# Altium PCB STM32F407VET6 2.PcbDoc
Units mm, origin at the board's own origin, x right, y up, seen from the top; angles counter-clockwise.
Board outline 85.1 x 72.5 mm, 4 copper layers (Top Layer, PWR, GND, Bottom Layer), stack 0.487 mm thick; 78 components, 115 nets, 433 pads, 39 vias.
Unrouted connection lines stored in the file: 292.
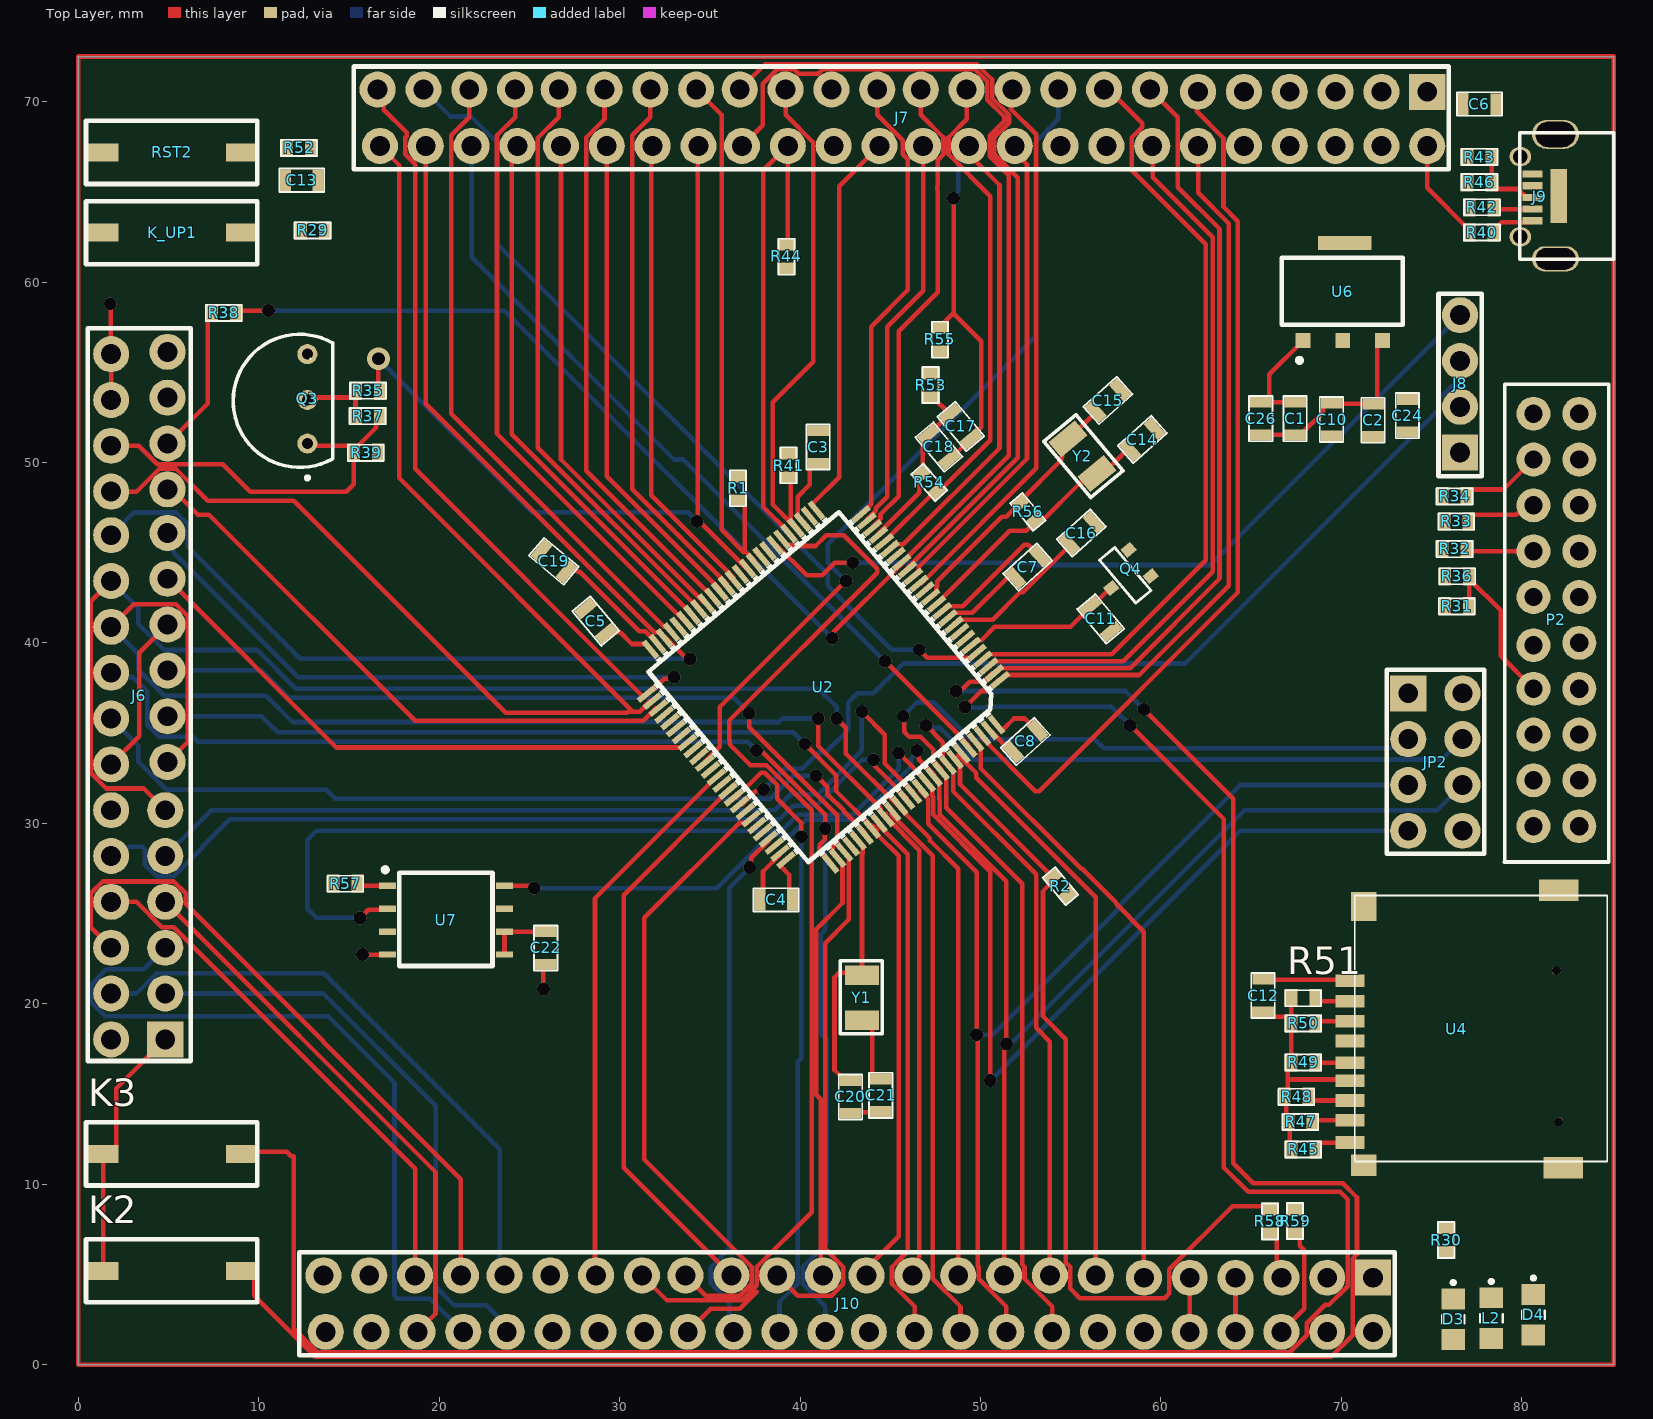
[diagram p0: Top Layer view]
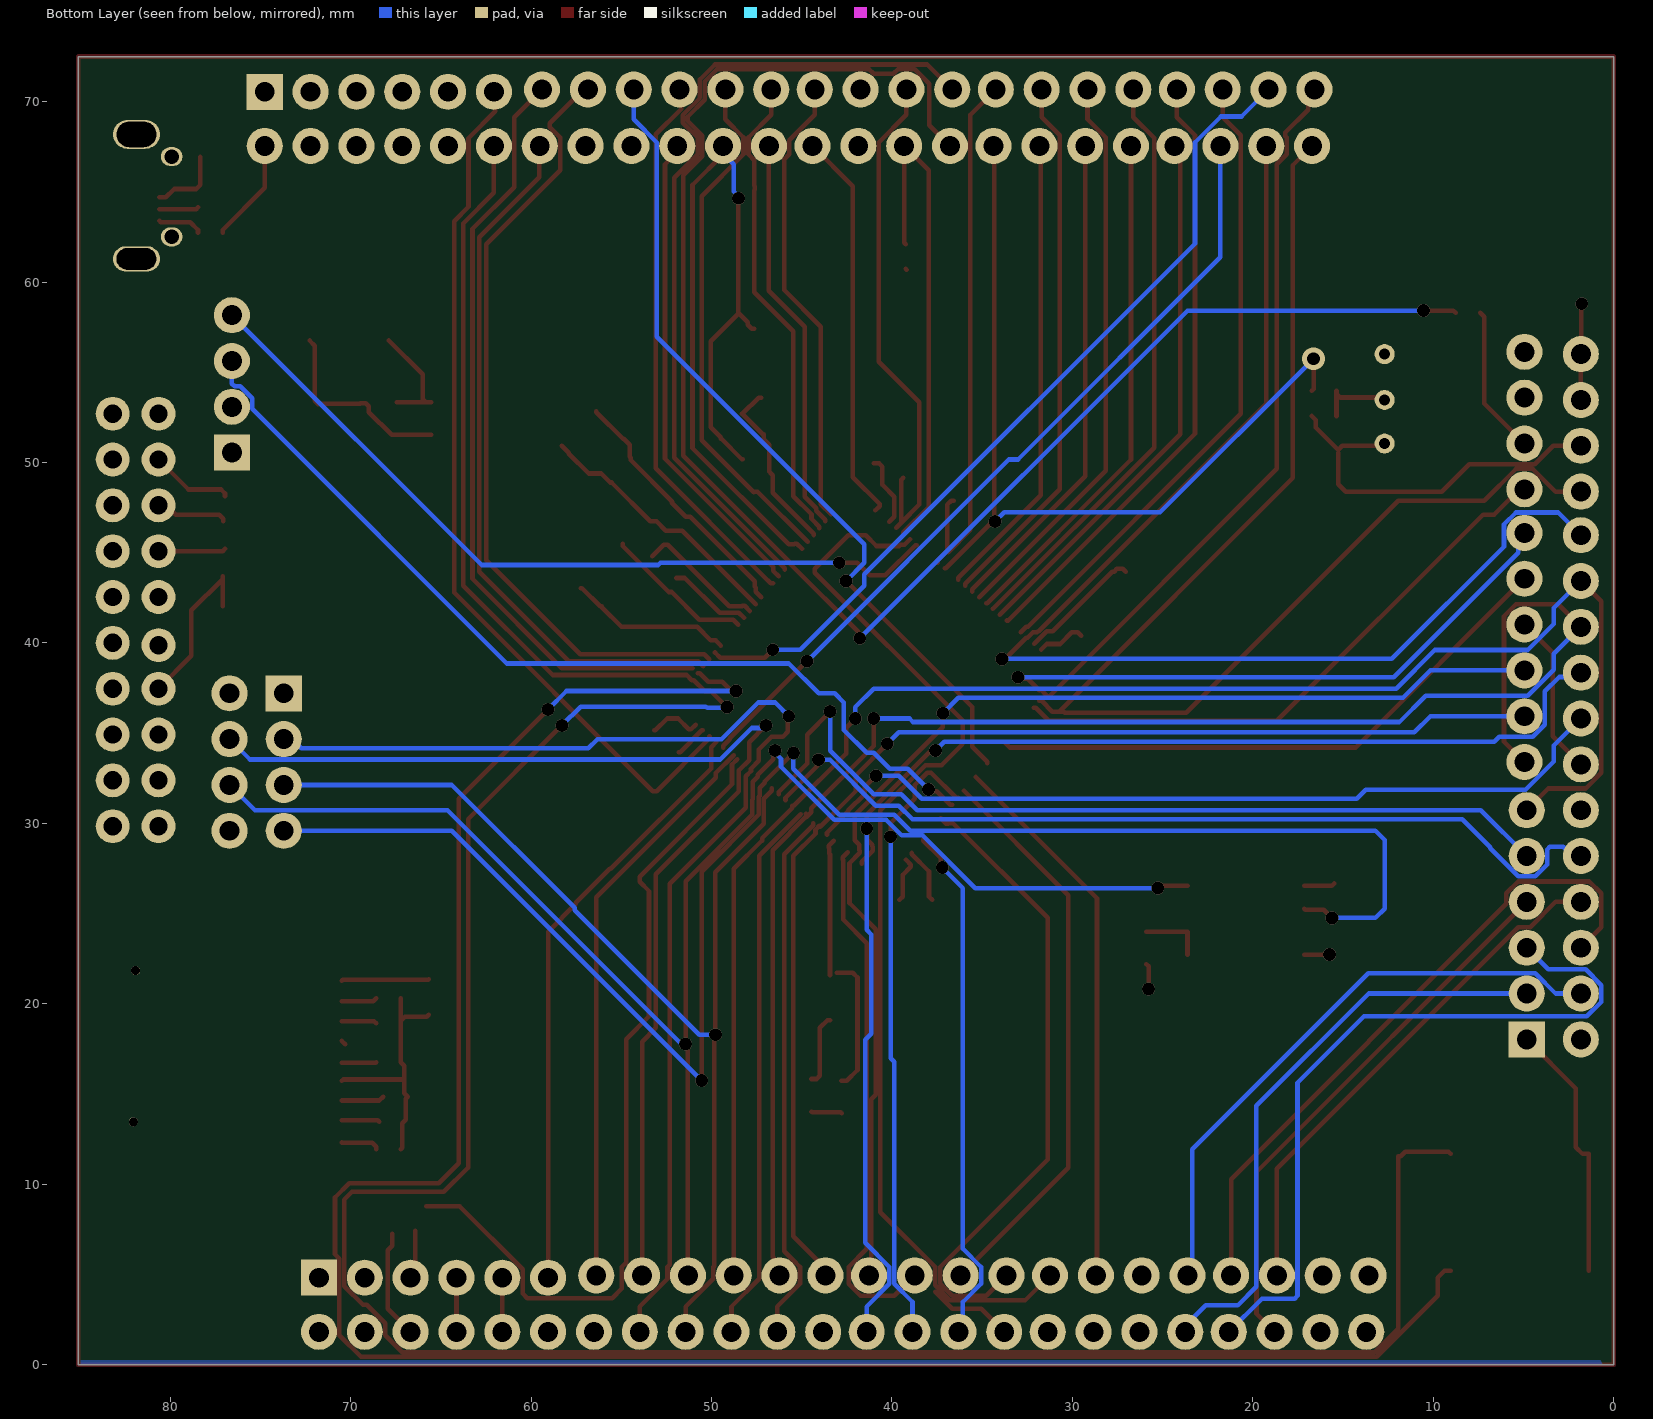
[diagram p1: Bottom Layer view, seen from below]
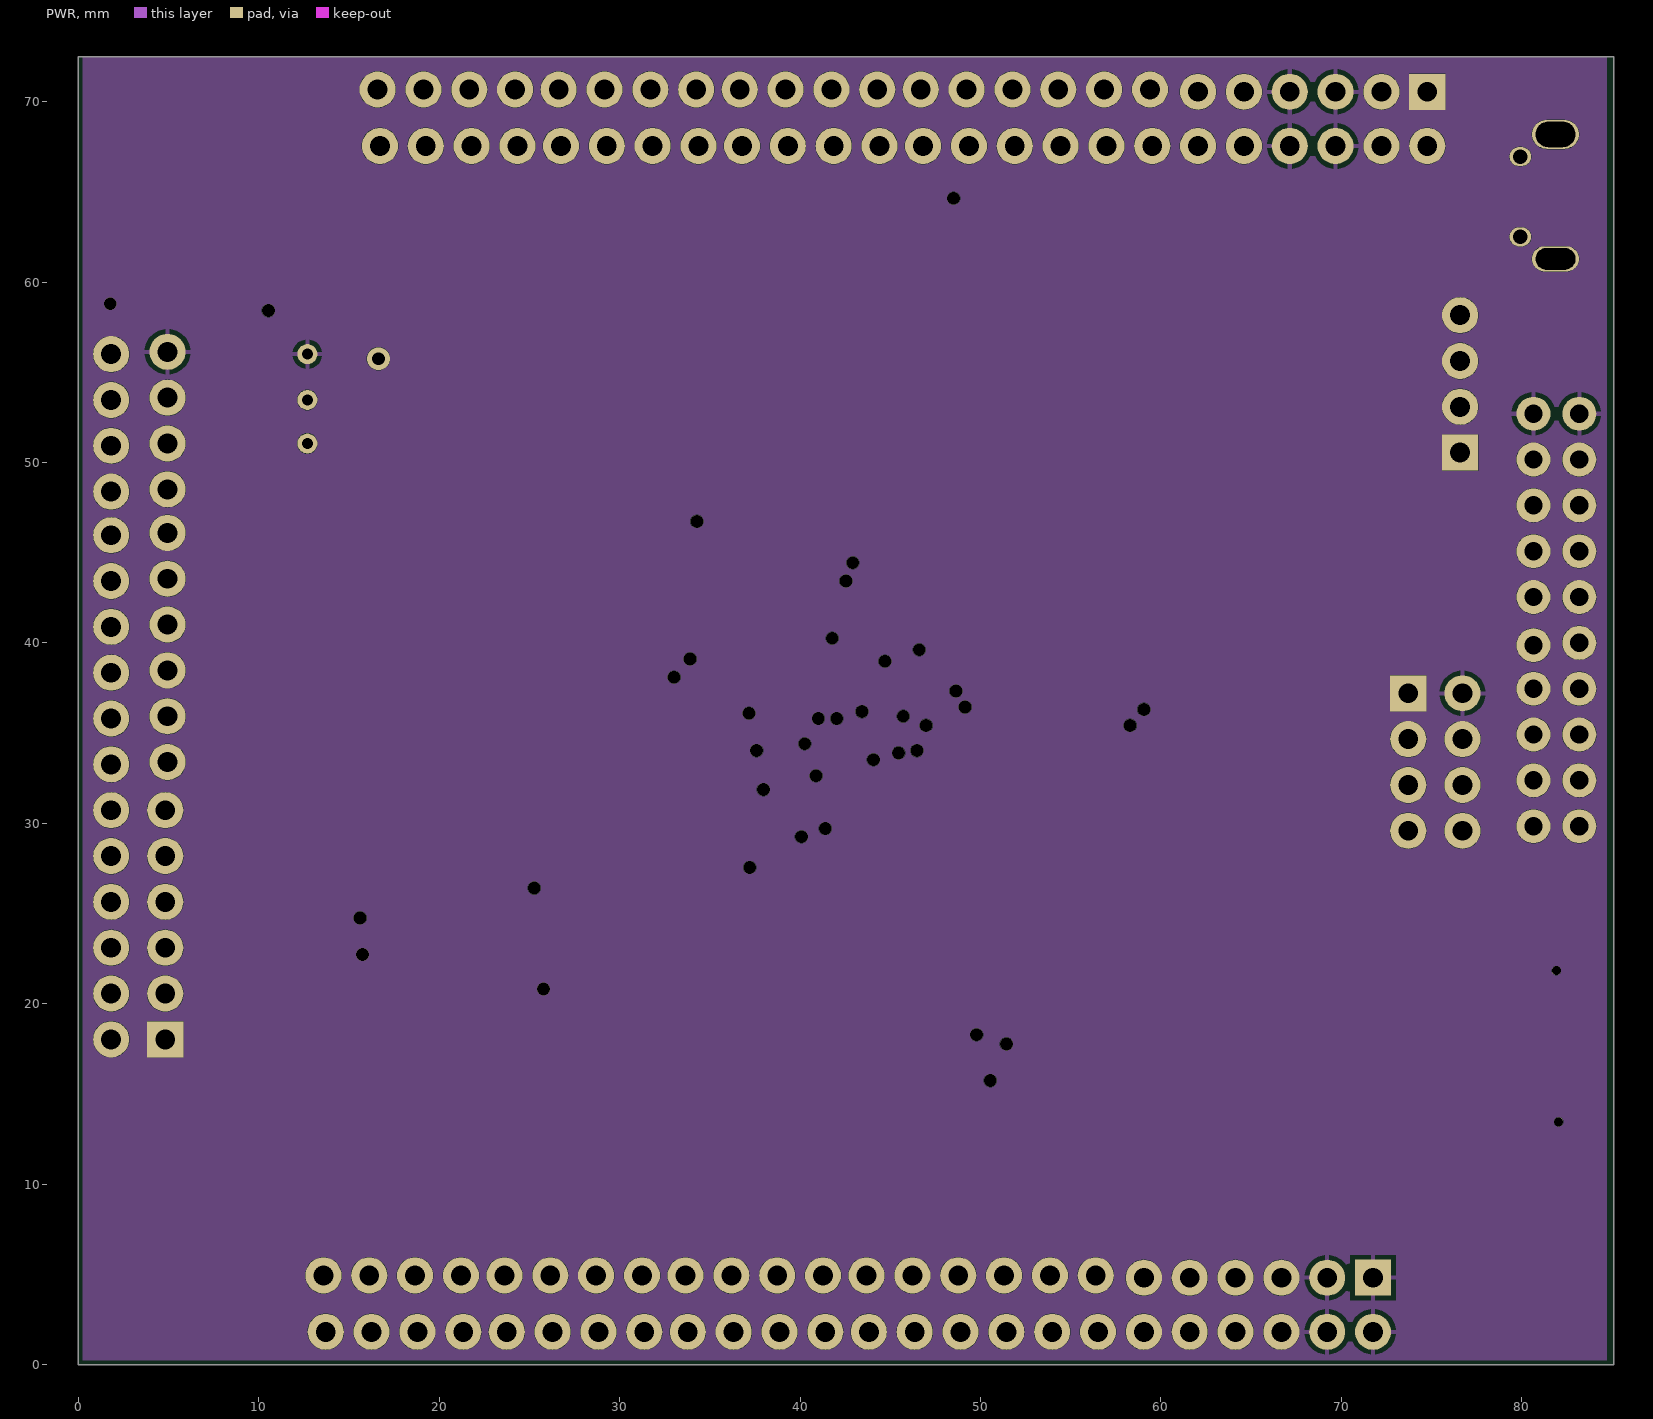
[diagram p2: PWR]
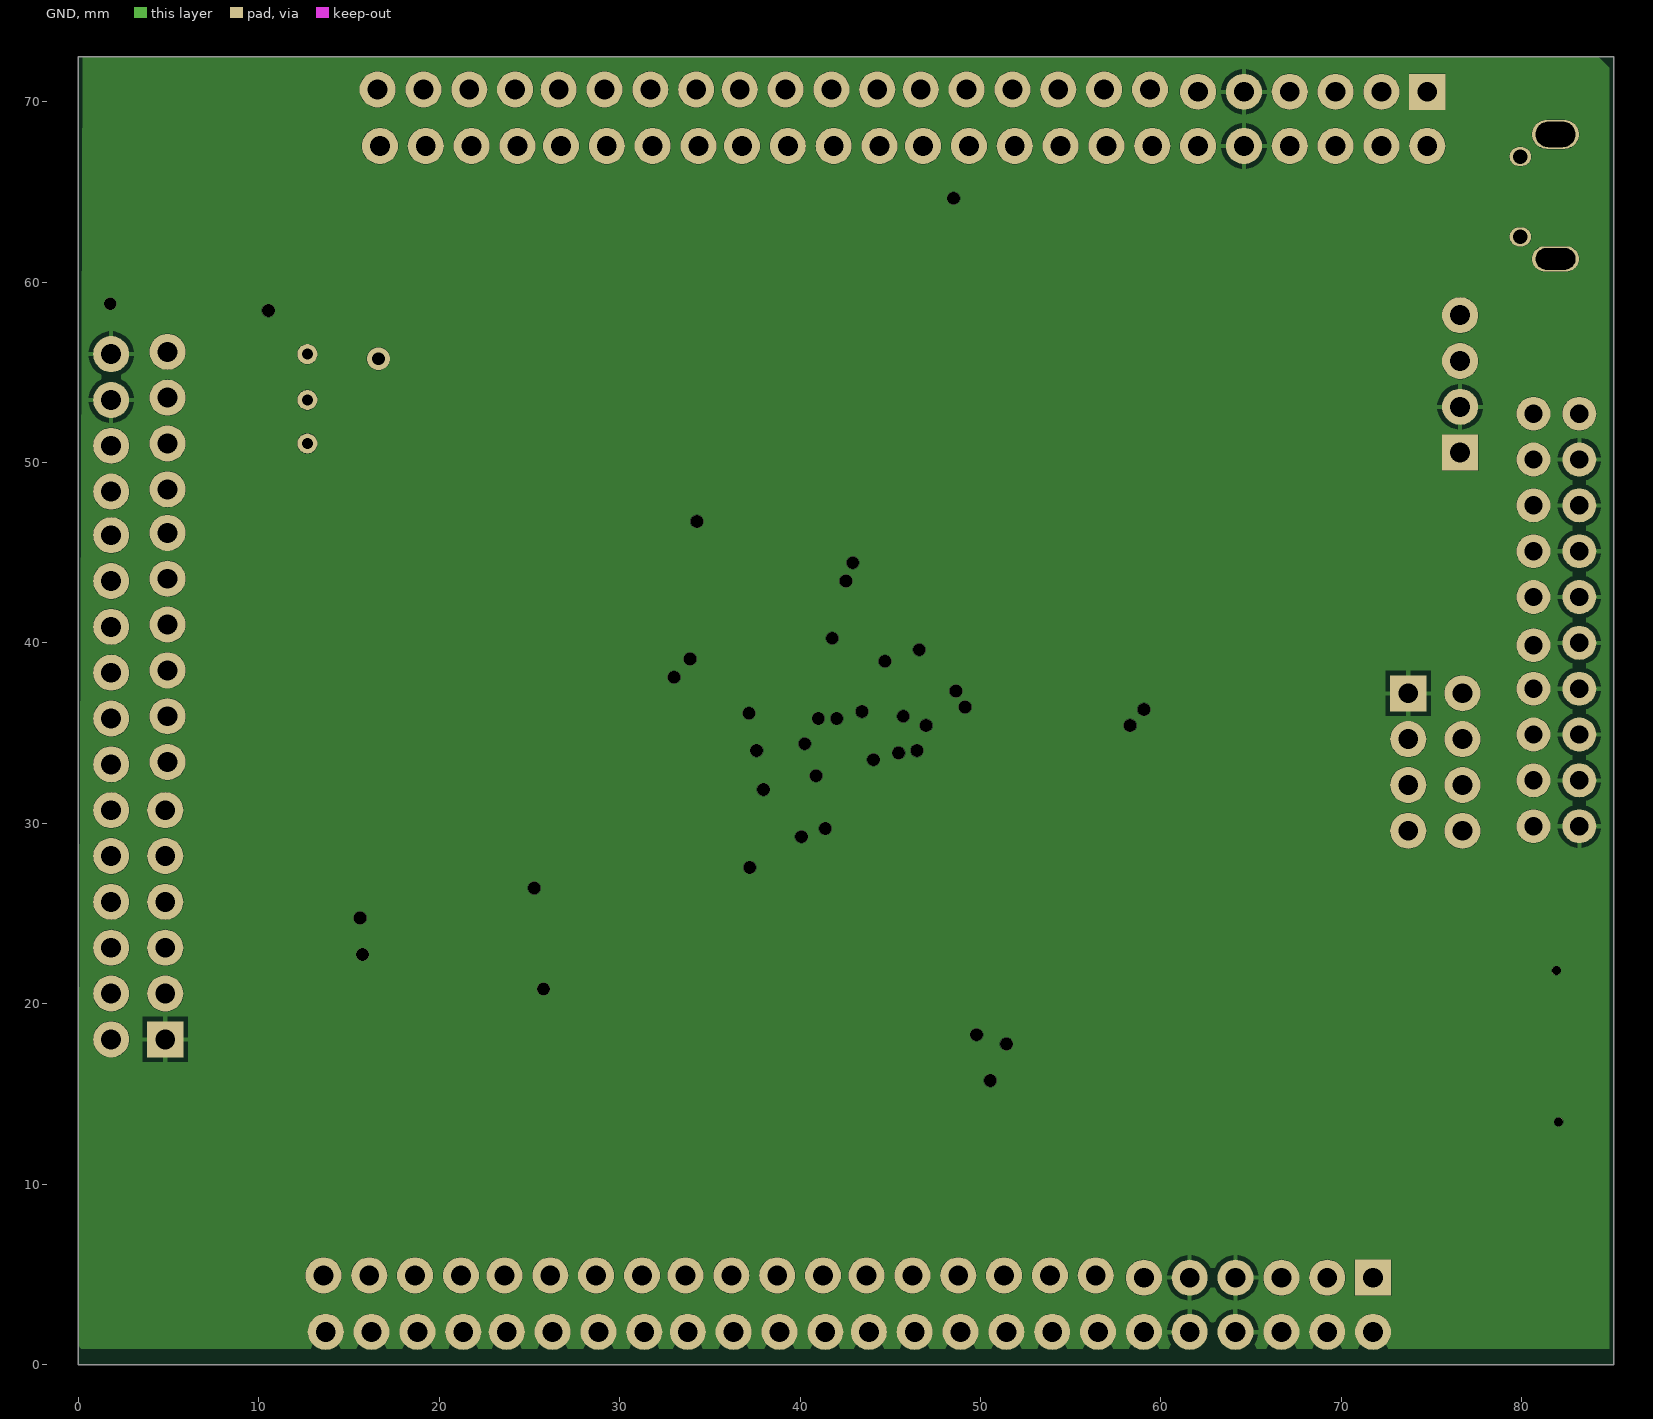
[diagram p3: GND]

## Layer stack, top to bottom
Top Solder: solder mask 0.0102, Solder Resist, Dk 3.5
Top Layer: signal copper 0.0356
Dielectric 2: prepreg 0.0711, PP-006, Dk 4.1
PWR: signal copper 0.035
Dielectric 1: core 0.2032, Core-025, Dk 4.6
GND: signal copper 0.035
Dielectric 3: prepreg 0.0711, PP-006, Dk 4.1
Bottom Layer: signal copper 0.0356
Bottom Solder: solder mask 0.0102, Solder Resist, Dk 3.5

## Board outline
0,0 0,72.5 85.097,72.5 85.097,0

## Design rules (kind name [scope] priority, off if disabled: settings)
Clearance [All] p1: gap=0.003 ignorepadtopadclearanceinfootprint=FALSE
PolygonConnect [All] p1: connectstyle=Relief reliefconductorwidth=0.254 reliefentries=4 polygonreliefangle="90 Angle" airgapwidth=0.254
RoutingVias [All] p1: holewidth=0.711 width=1.27 viastyle="Through Hole" minholewidth=0.711 minwidth=1.27 maxholewidth=0.711 maxwidth=1.27
SolderMaskExpansion [All] p1: expansion=0.102 istentingtop=FALSE
SupplyNets "Schematic Supply Nets_5" [InNet('3V3')] p1: voltage=0.000
SupplyNets "Schematic Supply Nets_4" [InNet('5V')] p2: voltage=0.000
SupplyNets "Schematic Supply Nets_1" [InNet('+3V3')] p3: voltage=0.000
SupplyNets "Schematic Supply Nets_2" [InNet('VCC')] p4: voltage=0.000
SupplyNets "Schematic Supply Nets" [InNet('GND')] p5: voltage=0.000
Width [All] p1: maxlimit=0.254 minlimit=0.254 preferedwidth=0.254
30 further rules are at their usual default settings.

## Components (designator, comment, footprint, x,y, rotation, side; value= is the part's Value field where it differs from the comment)
C1 "1" CAPACITOR 67.545,51.6 r90 top
C2 "1" CAPACITOR 71.647,53.175 r270 top
C3 "capacitor symbol" CAPACITOR 40.894,51.689 r270 top value=1uF
C4 "capacitor symbol" CAPACITOR 37.846,25.654 r0 top value=1uF
C5 "capacitor symbol" CAPACITOR 28.067,41.783 r310 top value=1uF
C6 "capacitor symbol" CAPACITOR 78.486,69.977 r180 top value=1uF
C7 "capacitor symbol" CAPACITOR 52.07,43.561 r42 top value=1uF
C8 "capacitor symbol" CAPACITOR 51.943,33.909 r42 top value=1uF
C10 "capacitor symbol" CAPACITOR 69.342,53.213 r270 top value=1uF
C11 "capacitor symbol" CAPACITOR 57.277,40.767 r130 top value=1uF
C12 "capacitor symbol" CAPACITOR 65.551,21.298 r270 top value=1uF
C13 "capacitor symbol" CAPACITOR 11.557,65.532 r0 top value=1uF
C14 "capacitor symbol" CAPACITOR 59.514,51.917 r222 top value=1uF
C15 "capacitor symbol" CAPACITOR 57.609,54.076 r222 top value=1uF
C16 "capacitor symbol" CAPACITOR 56.134,46.736 r222 top value=1uF
C17 "capacitor symbol" CAPACITOR 49.53,51.435 r130 top value=1uF
C18 "capacitor symbol" CAPACITOR 48.318,50.298 r130 top value=1uF
C19 "capacitor symbol" CAPACITOR 25.649,44.978 r320 top value=1uF
C20 "capacitor symbol" CAPACITOR 42.907,14.008 r90 top value=1uF
C21 "capacitor symbol" CAPACITOR 44.577,14.097 r90 top value=1uF
C22 "capacitor symbol" CAPACITOR 26.016,22.263 r90 top value=1uF
C24 "capacitor symbol" CAPACITOR 73.552,53.429 r270 top value=1uF
C26 "capacitor symbol" CAPACITOR 65.64,51.6 r90 top value=1uF
D3 "LED" LED 76.121,3.62 r270 top
D4 "LED" LED 80.566,3.874 r270 top
J6 "1" "Header 16x2" 4.926,18.034 r180 top
J7 "1" "Header 24x2" 74.759,70.544 r270 top
J8 "hg" "4 PIN HEADEER STM32" 76.581,50.546 r180 top
J9 "1" USB 85.092,64.77 r180 top
J10 "1" "HEADER 24X2" 71.755,4.826 r270 top
JP2 "1" "8 PIN HEADER" 73.708,37.211 r0 top
K2 "SW-PB" "RESET PUSH BUTTON SINGLE" 5.207,5.207 r270 top
K3 "SW-PB" "RESET PUSH BUTTON SINGLE" 5.207,11.684 r270 top
K_UP1 "SW-PB" "RESET PUSH BUTTON SINGLE" 5.207,62.738 r270 top
L2 "LED" LED 78.232,3.683 r270 top
P2 "1" ARM_JTAG 80.645,52.832 r0 top
Q3 "2" "PNP TRANSISTOR" 12.7,53.467 r90 top
Q4 "1" BAT54C 58.166,43.815 r130 top
R1 "Resistor 1206" RESISTOR 36.576,49.279 r270 top
R2 "Resistor 1206" RESISTOR 54.875,25.979 r130 top
R29 "Resistor 1206" RESISTOR 12.287,62.865 r0 top
R30 "Resistor 1206" RESISTOR 75.819,7.623 r270 top
R31 "Resistor 1206" RESISTOR 75.689,42.037 r0 top
R32 "Resistor 1206" RESISTOR 75.562,45.212 r0 top
R33 "Resistor 1206" RESISTOR 75.66,46.736 r0 top
R34 "Resistor 1206" RESISTOR 75.562,48.133 r0 top
R35 "1.5k" RESISTOR 16.767,53.975 r180 top
R36 "Resistor 1206" RESISTOR 77.121,43.688 r180 top
R37 "resistor 4.7k" RESISTOR 15.335,52.578 r0 top
R38 "1.5k" RESISTOR 7.363,58.293 r0 top
R39 "1.5k" RESISTOR 15.237,50.546 r0 top
R40 "22" RESISTOR 78.489,62.738 r180 top
R41 "Resistor 1206" RESISTOR 39.37,50.549 r270 top
R42 "22" RESISTOR 78.489,64.135 r180 top
R43 "22" RESISTOR 78.362,66.929 r180 top
R44 "Resistor 1206" RESISTOR 39.243,60.703 r90 top
R45 "4.7k" RESISTOR 67.18,11.938 r0 top
R46 "22" RESISTOR 78.362,65.532 r180 top
R47 "4.7k" RESISTOR 67.024,13.462 r0 top
R48 "4.7k" RESISTOR 66.799,14.859 r0 top
R49 "4.7k" RESISTOR 67.18,16.764 r0 top
R50 "4.7k" RESISTOR 67.18,18.923 r0 top
R51 "4.7k" RESISTOR 67.18,20.32 r0 top
R52 "Resistor 1206" RESISTOR 11.525,67.437 r0 top
R53 "Resistor 1206" RESISTOR 47.244,54.994 r270 top
R54 "Resistor 1206" RESISTOR 46.688,49.427 r312 top
R55 "Resistor 1206" RESISTOR 47.752,56.102 r90 top
R56 "1M" RESISTOR 53.071,46.72 r130 top
R57 "10K" RESISTOR 14.094,26.67 r0 top
R58 "Resistor 1206" RESISTOR 66.04,7.236 r90 top
R59 "Resistor 1206" RESISTOR 67.437,8.668 r270 top
RST2 "SW-PB" "RESET PUSH BUTTON SINGLE" 5.207,67.183 r270 top
U2 "1" STM32F407VET6 50.79,35.429 r220 top
U4 "1" "SD CARD READER CONNECTOR" 77.47,18.796 r90 top
U6 "AM111-3.3V" AMS1117-3.3V 69.977,59.563 r0 top
U7 "1" "W25Q16 FLASH" 17.145,26.543 r0 top
Y1 "32.768K" CRYSTAL 43.434,21.59 r270 top
Y2 "8M" CRYSTAL 56.466,49.393 r130 top

## Footprints (in the part's own frame and the unit in brackets; to place one, negate y for a bottom-side part, rotate by r counter-clockwise, add the part's x,y. Pads: shape width x height; smd on the part's side, far side on the other; paste and mask are expansions set on the pad)
"4 PIN HEADEER STM32" [mm]
  rect 2x2 hole 1.1: 1(0,0)
  round 2 hole 1.1: 2(0,-2.54) 3(0,-5.08) 4(0,-7.62)
  silkscreen extent -1.2,-8.8 1.2,1.3
"8 PIN HEADER" [mm]
  rect 2x2 hole 1.1: 1(0,0)
  round 2 hole 1.1: 2(3,0) 3(0,-2.54) 4(3,-2.54) 5(0,-5.08) 6(3,-5.08) 7(0,-7.62) 8(3,-7.62)
  silkscreen extent -1.2,-8.9 4.2,1.3
AMS1117-3.3V [mm]
  rect 0.83x0.83 smd paste-2539.97 mask-2539.97: 1(-2.1,-2.8) 2(0.1,-2.8) 3(2.3,-2.8)
  rect 2.97x0.762 smd paste-2539.97 mask-2539.97: 4(0.2,2.6)
  silkscreen extent -3.27,-4.03 3.43,1.78
ARM_JTAG [mil]
  round 74 hole 40: 1(0,-5) 2(100,-5) 3(0,-105) 4(100,-105) 5(0,-205) 6(100,-205) 7(0,-305) 8(100,-305) 9(0,-405) 10(100,-405) 11(0,-510) 12(100,-505) 13(0,-605) 14(100,-605) 15(0,-705) 16(100,-705) 17(0,-805) 18(100,-805) 19(0,-905) 20(100,-905)
  silkscreen extent -63,-983 164,59
BAT54C [mm]
  rect 0.6x0.7 smd paste+0 mask+0.102: 1(-0.9,-0.9) 2(1,-0.9) 3(0,1.2)
  silkscreen extent -1.51,-0.4 1.6,0.7
CAPACITOR [mm]
  rect 0.6x1.2 smd paste-2539.97 mask-2539.97: 1(-0.069,0.117) 2(1.74,0.108)
  silkscreen extent -0.42,-0.54 2.08,0.76
CRYSTAL [mm]
  rect 1.1x1.9 smd paste-2539.97 mask-2539.97: 1(0,0) 2(2.5,0)
  silkscreen extent -0.8,-1.2 3.25,1.12
"Header 16x2" [mm]
  rect 2x2 hole 1.1: 1(0.1,0)
  round 2 hole 1.1: 2(3.1,0) 3(0.1,-2.54) 4(3.1,-2.54) 5(0.1,-5.08) 6(3.1,-5.08) 7(0.1,-7.62) 8(3.1,-7.62) 9(0.1,-10.16) 10(3.1,-10.16) 11(0.1,-12.7) 12(3.1,-12.7) 13(-0.027,-15.367) 14(3.1,-15.24) 15(-0.027,-17.907) 16(3.1,-17.78) 17(-0.027,-20.447) 18(3.1,-20.32) 19(-0.027,-22.987) 20(3.1,-22.86) 21(-0.027,-25.527) 22(3.1,-25.4) 23(-0.027,-28.067) 24(3.1,-27.94) 25(-0.027,-30.48) 26(3.1,-30.353) 27(-0.027,-33.02) 28(3.1,-32.893) 29(-0.027,-35.56) 30(3.1,-35.433) 31(-0.027,-38.1) 32(3.1,-37.973)
  silkscreen extent -1.3,-39.4 4.4,1.2
"Header 24x2" [mm]
  rect 2x2 hole 1.1: 1(0,0)
  round 2 hole 1.1: 2(3,0) 3(0,-2.54) 4(3,-2.54) 5(0,-5.08) 6(3,-5.08) 7(0,-7.62) 8(3,-7.62) 9(0,-10.16) 10(3,-10.16) 11(0,-12.7) 12(3,-12.7) 13(-0.127,-15.367) 14(3,-15.24) 15(-0.127,-17.907) 16(3,-17.78) 17(-0.127,-20.447) 18(3,-20.32) 19(-0.127,-22.987) 20(3,-22.86) 21(-0.127,-25.527) 22(3,-25.4) 23(-0.127,-28.067) 24(3,-27.94) 25(-0.127,-30.48) 26(3,-30.353) 27(-0.127,-33.02) 28(3,-32.893) 29(-0.127,-35.56) 30(3,-35.433) 31(-0.127,-38.1) 32(3,-37.973) 33(-0.127,-40.513) 34(3,-40.386) 35(-0.127,-43.053) 36(3,-42.926) 37(-0.127,-45.593) 38(3,-45.466) 39(-0.127,-48.133) 40(3,-48.006) 41(-0.127,-50.546) 42(3,-50.419) 43(-0.127,-53.086) 44(3,-52.959) 45(-0.127,-55.626) 46(3,-55.499) 47(-0.127,-58.166) 48(3,-58.039)
  silkscreen extent -1.4,-59.5 4.3,1.2
"HEADER 24X2" [mm]
  rect 2x2 hole 1.1: 1(0,0)
  round 2 hole 1.1: 2(3,0) 3(0,-2.54) 4(3,-2.54) 5(0,-5.08) 6(3,-5.08) 7(0,-7.62) 8(3,-7.62) 9(0,-10.16) 10(3,-10.16) 11(0,-12.7) 12(3,-12.7) 13(-0.127,-15.367) 14(3,-15.24) 15(-0.127,-17.907) 16(3,-17.78) 17(-0.127,-20.447) 18(3,-20.32) 19(-0.127,-22.987) 20(3,-22.86) 21(-0.127,-25.527) 22(3,-25.4) 23(-0.127,-28.067) 24(3,-27.94) 25(-0.127,-30.48) 26(3,-30.353) 27(-0.127,-33.02) 28(3,-32.893) 29(-0.127,-35.56) 30(3,-35.433) 31(-0.127,-38.1) 32(3,-37.973) 33(-0.127,-40.513) 34(3,-40.386) 35(-0.127,-43.053) 36(3,-42.926) 37(-0.127,-45.593) 38(3,-45.466) 39(-0.127,-48.133) 40(3,-48.006) 41(-0.127,-50.546) 42(3,-50.419) 43(-0.127,-53.086) 44(3,-52.959) 45(-0.127,-55.626) 46(3,-55.499) 47(-0.127,-58.166) 48(3,-58.039)
  silkscreen extent -1.4,-59.5 4.3,1.2
LED [mm]
  rect 1.15x1.3 smd: A(2.223,0.079) C(-0.027,0.079)
  silkscreen extent -1.03,-0.55 1.33,0.7
"PNP TRANSISTOR" [mm]
  round 1.108 hole 0.6 mask+0.102: 1(-2.413,0) 2(0,0) 3(2.54,0)
  silkscreen extent -4.42,-1.4 3.64,4.11
"RESET PUSH BUTTON SINGLE" [mm]
  rect 1x1.7 smd paste-2539.97 mask-2539.97: 1(0,3.825) 2(0,-3.825)
  silkscreen extent -1.75,-4.77 1.75,4.73
RESISTOR [mm]
  rect 0.7x1 smd paste-2539.97 mask-2539.97: 1(1.4,0) 2(0.032,0)
  silkscreen extent -0.29,-0.46 1.7,0.44
"SD CARD READER CONNECTOR" [mm]
  rect 0.7x1.6 smd paste-2539.97 mask-2539.97: 1(-6.477,6.985) 2(-5.25,6.984) 3(-4.15,6.984) 4(-3.05,6.984) 5(-2.05,6.984) 6(-0.85,6.984) 7(0.25,6.984) 8(1.35,6.984) 9(2.493,6.984)
  rect 1.2x1.4 smd paste-2539.97 mask-2539.97: 10(-7.747,6.223)
  rect 1.6x1.4 smd paste-2539.97 mask-2539.97: 11(6.604,6.223)
  round 0.5 hole 0.5: 12(-5.334,-4.572) 12(3.048,-4.445)
  rect 1.2x2.2 smd paste-2539.97 mask-2539.97: 12(7.493,-4.572) 13(-7.874,-4.826)
  silkscreen extent -7.52,-7.27 7.21,6.73
STM32F407VET6 [mm]
  rect 1.2x0.32 smd: 1(-1.849,-1.729) 2(-1.849,-2.229) 3(-1.849,-2.729) 4(-1.849,-3.229) 5(-1.849,-3.729) 6(-1.849,-4.229) 7(-1.849,-4.729) 8(-1.849,-5.229) 9(-1.849,-5.729) 10(-1.849,-6.229) 11(-1.849,-6.729) 12(-1.849,-7.229) 13(-1.849,-7.729) 14(-1.849,-8.229) 15(-1.849,-8.729) 16(-1.849,-9.229) 17(-1.849,-9.729) 18(-1.849,-10.229) 19(-1.849,-10.729) 20(-1.849,-11.229) 21(-1.849,-11.729) 22(-1.849,-12.229) 23(-1.849,-12.729) 24(-1.849,-13.229) 25(-1.849,-13.729) 51(13.651,-13.729) 52(13.651,-13.229) 53(13.651,-12.729) 54(13.651,-12.229) 55(13.651,-11.729) 56(13.651,-11.229) 57(13.651,-10.729) 58(13.651,-10.229) 59(13.651,-9.729) 60(13.651,-9.229) 61(13.651,-8.729) 62(13.651,-8.229) 63(13.651,-7.729) 64(13.651,-7.229) 65(13.651,-6.729) 66(13.651,-6.229) 67(13.651,-5.729) 68(13.651,-5.229) 69(13.651,-4.729) 70(13.651,-4.229) 71(13.651,-3.729) 72(13.651,-3.229) 73(13.651,-2.729) 74(13.651,-2.229) 75(13.651,-1.729)
  rect 0.32x1.2 smd: 26(-0.099,-15.479) 27(0.401,-15.479) 28(0.901,-15.479) 29(1.401,-15.479) 30(1.901,-15.479) 31(2.401,-15.479) 32(2.901,-15.479) 33(3.401,-15.479) 34(3.901,-15.479) 35(4.401,-15.479) 36(4.901,-15.479) 37(5.401,-15.479) 38(5.901,-15.479) 39(6.401,-15.479) 40(6.901,-15.479) 41(7.401,-15.479) 42(7.901,-15.479) 43(8.401,-15.479) 44(8.901,-15.479) 45(9.401,-15.479) 46(9.901,-15.479) 47(10.401,-15.479) 48(10.901,-15.479) 49(11.401,-15.479) 50(11.901,-15.479) 76(11.901,0.021) 77(11.401,0.021) 78(10.901,0.021) 79(10.401,0.021) 80(9.901,0.021) 81(9.401,0.021) 82(8.901,0.021) 83(8.401,0.021) 84(7.901,0.021) 85(7.401,0.021) 86(6.901,0.021) 87(6.401,0.021) 88(5.901,0.021) 89(5.401,0.021) 90(4.901,0.021) 91(4.401,0.021) 92(3.901,0.021) 93(3.401,0.021) 94(2.901,0.021) 95(2.401,0.021) 96(1.901,0.021) 97(1.401,0.021) 98(0.901,0.021) 99(0.401,0.021) 100(-0.099,0.021)
  silkscreen extent -1.23,-14.86 13.02,-0.61
USB [mm]
  rect 1.1x0.4 smd paste-2539.97 mask-2539.97: 1(4.5,1.377) 2(4.5,0.727) 3(4.5,0.077) 5(4.5,-1.223) 5(4.5,-0.573)
  oval 1.2x1.05 hole 0.8: 6(5.174,2.266) 7(5.174,-2.184)
  oval 2.6x1.4 hole 1.2 slot 2.2 at 0 deg: 8(3.224,3.486)
  oval 2.6x1.6 hole 1.4 slot 2.2 at 0 deg: 9(3.224,-3.414)
  rect 0.9x3 smd paste+0 mask+0.102: 10(3.05,0)
  silkscreen extent 0,-3.5 5.21,3.5
"W25Q16 FLASH" [mm]
  rect 0.96x0.35 smd paste-2539.97 mask-2539.97: 1(0,0) 2(0,-1.27) 3(0,-2.54) 4(0,-3.81) 5(6.477,0) 6(6.477,-1.27) 7(6.477,-2.54) 8(6.477,-3.81)
  silkscreen extent -0.25,-4.44 5.81,1.02

## Part data
C1 C2: library part "Polar capacitor"
J6: library part "Header 16x2"
J7 J10: library part "Header 24x2"
J8: library part "4 Pin header"
J9: library part usb
JP2: library part NRF2401
K2 K3 K_UP1 RST2: library part "Rest puch button"
P2: library part ARM_JTAG
Q3: library part "pnp transistor"
Q4: library part BAT54C
R1 R2 R29 R30 R31 R32 R33 R34 R36 R41 R44 R52 R53 R54 R55 R58 R59: Manuf=YAGEO, Mfr. Part #=RC1206FR-0710KL, Package=1206, Seller=LCSC, Seller Part #=C132649
R35 R38 R39 R40 R42 R43 R45 R46 R47 R48 R49 R50 R51: library part "resistor 4.7k"
R56 R57: library part "Resistor 1206", Manuf=YAGEO, Mfr. Part #=RC1206FR-0710KL, Package=1206, Seller=LCSC, Seller Part #=C132649
U2: library part STM32F407VET6
U4: library part "Mini sd card"
U7: library part "W25Q16 Flash"
Y1 Y2: library part crystal

## Via types
v1: diameter 0.711, hole 0.711, Top Layer to Bottom Layer, 37 vias
v2: diameter 1.27, hole 0.711, Top Layer to Bottom Layer, 1 vias
v3: diameter 0.7, hole 0.7, Top Layer to Bottom Layer, 1 vias

## Nets (pads, with @x,y where several pads share a name; then routed paths per layer and width w, separated by ;. In a path a pad name is that pad's centre, name@x,y a point inside that pad or via, vN(x,y) a via of type N, cw(c..) or ccw(c..) an arc to the next point about the centre after c; other vN are vias at no path point)
3V3: C3.2 C4.2 C5.2 C6.2 C7.2 C8.2 C10.2 J6.31 J7.5 J7.6 J7.7 J7.8 J10.1 J10.2 J10.3 J10.4 JP2.2 P2.1 P2.2 Q3.3 R29.1 R31.2 R32.2 R33.2 R34.2 R46.1 R52.1 R53.2 R57.2 U2.11 U2.28 U2.50 U2.75 U2.100 U7.3 | length 19.4
  Top Layer w0.254: C5.2@29.522,40.392 29.715,40.585 30.032,40.585 30.676,39.941 31.42,39.941 U2.50 ; U2.75 38.96,27.717 38.96,27.598 39.413,27.145 39.413,25.935 C4.2 ; U2.28 39.867,46.99 39.867,48.112 40.529,48.774 40.529,49.776 40.702,49.949 C3.2 ; U2.11 48.164,42.055 48.284,42.055 48.311,42.028 49.013,42.028 52.436,45.451 52.646,45.451 C7.2 ; U2.100 51.141,35.215 51.261,35.215 51.86,35.814 52.451,35.814 53.112,35.153 C8.2
5V: J7.1 J7.2 J7.3 J7.4 J8.1 R40.1 | length 5.8
  Top Layer w0.254: J7.2 74.759,65.218 77.089,62.888 R40.1
+3V3: C2.2 C12.2 C24.2 R45.2 R47.2 R48.2 R49.2 R50.2 R51.2 U4.4 U6.2 | length 13.9
  Top Layer w0.254: C12.2@65.678,19.393 65.775,19.296 66.989,19.296 R50.2@67.212,19.073 ; R45.2 67.134,12.016 67.134,13.384 R47.2 66.944,13.574 66.944,14.747 R48.2 67.022,15.05 67.022,15.811 ; R51.2 R50.2@67.212,19.073 ; U4.4 70.421,15.811 67.022,15.811 ; 67.022,15.811 67.022,16.573 R49.2 R50.2 R50.2@67.212,19.073
BOOT0: R2.1 R58.1 U2.94 | length 46.4
  Top Layer w0.254: U2.94 48.864,33.265 48.864,32.162 R2.1 53.975,26.761 53.467,26.253 53.467,19.304 54.737,18.034 54.737,5.662 54.978,5.421 54.978,4.226 55.508,3.696 60.211,3.696 60.465,3.95 60.465,5.294 63.965,8.794 R58.1@65.817,8.794
GND: C1.1 C2.1 C3.1 C4.1 C5.1 C6.1 C7.1 C8.1 C10.1 C11.1 C12.1 C13.2 C14.1 C15.1 C16.1 C19.1 C20.1 C21.1 C22.1 C24.1 C26.1 J6.1 J6.30 J6.32 J7.9 J7.10 J8.2 J9.5 J10.7 J10.8 J10.9 J10.10 JP2.1 K2.2 K3.2 P2.4 P2.6 P2.8 P2.10 P2.12 P2.14 P2.16 P2.18 P2.20 Q4.2 R1.2 R2.2 R36.1 R39.1 R55.2 RST2.2 U2.10 U2.27 U2.74 U2.99 U4.6 U4.9 U6.3 U7.4 | length 55.9
  Top Layer w0.254: K2.2 K3.2 1.732,11.684 2.105,12.057 2.105,15.313 J6.1 ; v1(1.778,58.801) 1.802,58.777 1.802,56.031 J6.32 J6.30 ; v1(15.748,22.733) U7.4 ; v1(25.781,20.828) 25.781,22.076 C22.1 ; C4.1 37.95,25.944 37.95,27.335 38.9,28.285 U2.74 ; C20.1 42.834,13.983 44.415,13.983 C21.1 ; U2.10 48.485,41.672 49.546,41.672 51.476,43.602 C7.1 ; U2.99 50.536,35.155 51.742,33.95 C8.1 ; J10.10 J10.9 ; J10.8 J10.7 ; C26.1 C1.1 67.728,51.531 68.986,52.789 68.986,53.109 69.159,53.282 C10.1 69.478,53.263 71.745,53.263 C2.1 71.816,53.244 71.989,53.417 71.989,56.475 U6.3 ; C12.1 65.707,21.328 70.447,21.328 U4.9 ; U4.6@70.297,17.757 U4.6
NetC1_2: C1.2 C26.2 U6.1 | length 6.5
  Top Layer w0.254: C1.2 C26.2 65.832,53.34 66.005,53.513 66.005,54.891 U6.1
NetC14_2: C14.2 R56.2 U2.12 Y2.1 | length 14.4
  Top Layer w0.254: U2.12 51.632,46.228 52.534,46.228 R56.2 53.395,46.745 55.545,48.895 55.622,48.895 56.12,49.393 56.813,49.393 57.912,50.492 57.912,50.546 C14.2@58.293,50.927
NetC15_2: C15.2 R56.1 U2.13 Y2.2 | length 14.3
  Top Layer w0.254: U2.13 47.543,42.843 47.543,43.063 47.61,43.131 47.61,43.419 51.181,46.99 51.435,46.99 52.214,47.769 R56.1@52.214,47.792 ; R56.1 52.171,47.828 54.483,50.14 54.483,50.254 54.538,50.309 54.538,50.986 Y2.2 54.909,51.308 56.388,52.787 C15.2
NetC16_2: C16.2 U2.9 | length 8.3
  Top Layer w0.254: U2.9 48.807,41.289 50.676,41.289 52.212,42.825 52.364,42.825 54.913,45.374 C16.2
NetC17_2: C17.2 C18.2 R53.1 R54.2 U2.19 U2.22 | length 9.9
  Top Layer w0.254: U2.22 44.346,46.063 46.609,48.326 46.609,49.303 R54.2 46.81,49.504 46.81,50.981 47.117,51.288 C18.2 47.155,51.562 48.291,52.699 C17.2 48.289,52.699 47.394,53.594 R53.1
NetC19_2: C19.2 U2.49 | length 6.8
  Top Layer w0.254: C19.2 27.218,44.109 27.535,44.109 27.688,43.955 27.786,43.955 31.101,40.64 31.425,40.64 U2.49
NetC22_2: C22.2 U7.7 U7.8 | length 3.6
  Top Layer w0.254: U7.8 U7.7 C22.2
NetD3_2: R41.2
NetD4_2: R44.2 | length 0.1
  Top Layer w0.254: R44.2@39.195,60.687 R44.2
NetJ6_27: J6.27 R38.2 | length 8.3
  Top Layer w0.254: J6.27 7.172,53.273 7.172,58.07 R38.2
NetJ6_28: J6.28 Q3.1 R37.1 R39.2 | length 21.6
  Top Layer w0.254: J6.28 3.358,50.927 4.384,49.901 8.011,49.901 9.525,48.387 14.859,48.387 15.269,48.797 R39.2 ; Q3.1 12.835,50.919 15.046,50.919 15.269,50.696 16.512,51.939 16.512,52.355 R37.1
NetJ9_1: J9.1 R40.2 | length 2.5
  Top Layer w0.254: R40.2 78.457,62.888 78.889,63.32 80.519,63.32 J9.1
NetJ9_2: J9.2 R42.2 | length 2.2
  Top Layer w0.254: R42.2 78.549,64.043 J9.2
NetJ9_3: J9.3 R43.2 R46.2 | length 4.1
  Top Layer w0.254: R43.2 R46.2 78.33,65.382 78.553,65.159 79.776,65.159 80.242,64.693 J9.3
NetJ10_5: J10.5 R58.2 | length 2.7
  Top Layer w0.254: R58.2@66.413,7.426 66.413,5.088 J10.5
NetJ10_6: J10.6 R59.1 | length 6.1
  Top Layer w0.254: J10.6 67.945,3.096 67.945,6.35 67.691,6.604 R59.1@67.691,7.268
NetK_UP1_1: K_UP1.1 R29.2
NetL2_1: R30.1
NetP2_3: P2.3 R34.1 | length 4.6
  Top Layer w0.254: R34.1 76.962,48.283 77.185,48.506 78.986,48.506 P2.3
NetP2_5: P2.5 R33.1 | length 4
  Top Layer w0.254: R33.1 77.06,46.886 77.283,47.109 79.689,47.109 80.205,47.625 P2.5
NetP2_7: P2.7 R32.1 | length 3.7
  Top Layer w0.254: R32.1 77.089,45.085 P2.7
NetP2_13: P2.13 R31.1 R36.2 | length 9.3
  Top Layer w0.254: R31.1 R36.2 77.089,43.538 78.823,41.804 78.823,39.287 P2.13
NetQ3_2: Q3.2 R35.1 R37.2 | length 4.4
  Top Layer w0.254: Q3.2 12.835,53.602 15.144,53.602 15.367,53.825 R35.1 R37.2
NetR57_1: R57.1 U7.1 | length 1.7
  Top Layer w0.254: R57.1 15.621,26.543 U7.1
NetR60_1: U7.6
PA0: J7.23 U2.23 | length 26.5
  Top Layer w0.254: U2.23 44.024,46.446 44.46,46.881 44.46,47.127 45.466,48.133 45.466,57.277 47.625,59.436 47.625,64.577 47.622,64.58 47.622,65.088 47.6,65.11 47.6,65.32 47.625,65.345 47.625,66.752 47.949,67.076 47.949,68.013 46.692,69.27 J7.23
PA1: J7.24 U2.24 | length 22.1
  Top Layer w0.254: U2.24 43.703,46.829 44.203,47.328 44.203,47.47 44.831,48.099 44.831,57.531 46.819,59.519 J7.24
PA2: J7.25 U2.25 | length 25.3
  Top Layer w0.254: U2.25 43.942,47.695 43.942,57.531 45.974,59.563 45.974,66.791 45.689,67.076 45.689,67.86 44.279,69.27 J7.25
PA3: J7.26 U2.26 | length 21.8
  Top Layer w0.254: U2.26 40.684,47.583 40.684,47.702 42.164,49.182 42.164,65.302 J7.26
PA4: J7.27
PA5: J7.28
PA6: J7.29 R41.1 U2.29 | length 29.3
  Top Layer w0.254: J7.29 39.199,69.27 40.736,67.733 40.736,55.595 38.481,53.34 38.481,47.672 U2.29@39.484,46.669 ; R41.1 39.484,49.035 U2.29@39.484,46.669 ; U2.29@39.484,46.669 U2.29 U2.29@39.484,46.669
PA7: J7.30 R44.1 U2.30 | length 28.1
  Top Layer w0.254: R44.1 39.326,62.186 J7.30 37.973,66.191 37.973,47.538 39.384,46.127 U2.30
PA8: J10.33 U2.31 | length 60.5
  Top Layer w0.254: J10.33 32.629,3.566 36.77,3.566 37.605,4.401 37.605,5.421 40.64,8.456 40.64,30.734 38.142,33.232 37.253,33.232 36.108,34.377 36.108,34.631 36.068,34.671 36.068,35.687 44.281,43.9 44.281,44.111 42.418,45.974 41.463,45.974 40.861,45.372 39.593,45.372 39.56,45.406 39.526,45.439 39.305,45.439 U2.31
PA9: J8.4 J10.34 U2.32 | length 44.7
  Top Layer w0.254: U2.32 38.695,45.422 40.366,43.751 41.235,43.751 41.934,44.45 v1(42.926,44.45)
  Bottom Layer w0.254: v1(42.926,44.45) 52.83,44.45 52.957,44.323 62.738,44.323 J8.4
PA10: J8.3 J10.47 U2.67 | length 52.1
  Top Layer w0.254: U2.67 36.77,31.043 37.517,31.79 37.886,31.79 v1(37.973,31.877)
  Bottom Layer w0.254: v1(37.973,31.877) 39.116,33.02 40.132,33.02 41.021,33.909 41.402,33.909 42.672,35.179 42.672,36.703 43.18,37.211 44.069,37.211 45.72,38.862 61.341,38.862 75.451,52.972 75.451,53.554 76.113,54.216 76.432,54.216 76.581,54.365 J8.3
PA11: J10.32 R42.1 U2.68 | length 4.7
  Top Layer w0.254: J10.32 35.058,3.102 36.67,3.102 37.612,4.044
PA12: J10.31 R43.1 U2.69 | length 35.4
  Top Layer w0.254: J10.31 34.785,3.823 36.663,3.823 37.325,4.485 37.325,5.421 31.369,11.377 31.369,24.765 36.626,30.022 36.863,30.022 36.891,29.994 37.01,29.994 U2.69
PA13: U2.70
PA14: U2.71
PA15: J10.30 U2.72 | length 29.1
  Top Layer w0.254: v1(37.211,27.559) 37.298,27.646 37.298,28.092 38.257,29.051 U2.72
  Bottom Layer w0.254: J10.30 36.068,2.08 36.068,3.482 35.065,4.485 35.065,5.421 36.068,6.424 36.068,26.416 v1(37.211,27.559)
PB0: J7.33 R1.1 U2.35 | length 30.6
  Top Layer w0.254: J7.33 35.656,69.262 35.656,46.271 36.889,45.038 ; R1.1 36.726,47.879 36.949,47.656 36.949,45.098 37.469,44.578 U2.35
PB1: J7.34 R35.2 U2.36 | length 47.9
  Top Layer w0.254: v2(16.637,55.753) 16.637,54.073 R35.2 ; J7.34 34.332,67.503 34.332,46.778 v1(34.29,46.736) 34.414,46.736 37.013,44.136 U2.36
  Bottom Layer w0.254: v2(16.637,55.753) 25.146,47.244 33.782,47.244 v1(34.29,46.736)
PB2: R59.2 U2.37
PB3: J10.18 JP2.5 U2.89 | length 61.8
  Top Layer w0.254: U2.89 46.666,31.822 47.117,31.371 47.117,29.972 49.784,27.305 v1(49.784,18.288) 49.855,18.217 49.855,5.465 49.898,5.421 49.898,4.764 51.435,3.228 J10.18
  Bottom Layer w0.254: v1(49.784,18.288) 50.673,18.288 57.575,25.19 57.575,25.317 64.389,32.131 JP2.5
PB4: JP2.7 U2.90 U7.2 | length 93.1
  Top Layer w0.254: v1(15.621,24.765) 16.081,25.225 17.097,25.225 U7.2 ; v1(45.466,33.909) 45.466,33.905 47.049,32.321 U2.90 47.332,31.98 47.332,31.519 47.374,31.477 47.374,30.494 50.546,27.322 v1(50.546,15.748)
  Bottom Layer w0.254: v1(15.621,24.765) 13.208,24.765 12.7,25.273 12.7,29.083 13.208,29.591 38.989,29.591 39.878,30.48 42.926,30.48 45.466,33.02 v1(45.466,33.909) ; v1(50.546,15.748) 64.389,29.591 JP2.7
PB5: J10.17 JP2.6 U2.91 U7.5 | length 88.8
  Top Layer w0.254: U7.5 25.146,26.543 v1(25.273,26.416) ; v1(46.482,34.036) 46.569,33.949 46.569,33.567 47.432,32.704 U2.91 47.715,32.301 47.715,31.349 47.755,31.309 47.755,30.477 51.435,26.797 v1(51.435,17.78) 51.348,17.693 51.348,17.442 51.308,17.403 J10.17
  Bottom Layer w0.254: v1(25.273,26.416) 35.381,26.416 38.299,29.334 39.459,29.334 40.329,30.204 43.21,30.204 46.152,33.146 46.152,33.582 46.482,33.912 v1(46.482,34.036) ; v1(51.435,17.78) 51.522,17.867 51.776,17.867 64.63,30.721 75.298,30.721 JP2.6
PB6: J10.16 JP2.3 U2.92 | length 67.5
  Top Layer w0.254: v1(45.72,35.941) 45.767,35.894 45.767,35.074 46.043,34.798 46.675,34.798 47.374,34.099 47.374,33.466 47.815,33.025 U2.92 48.098,32.623 48.098,30.873 52.324,26.647 52.324,5.535 52.438,5.421 52.438,4.764 53.975,3.228 J10.16
  Bottom Layer w0.254: v1(45.72,35.941) 46.479,36.7 47.418,36.7 49.447,34.671 56.322,34.671 56.83,34.163 72.728,34.163 73.236,34.671 JP2.3
PB7: J10.15 JP2.4 U2.93 | length 64.3
  Top Layer w0.254: v1(46.99,35.433) 47.915,34.508 47.915,33.51 48.481,32.944 48.481,31.779 53.086,27.174 53.086,18.669 53.848,17.907 J10.15
  Bottom Layer w0.254: v1(46.99,35.433) 47.137,35.286 47.772,35.286 49.517,33.541 75.578,33.541 JP2.4
PB8: J10.14 JP2.8
PB9: J10.13 U2.95 | length 32
  Top Layer w0.254: 48.768,33.782 49.756,32.794 49.756,32.54 56.388,25.908 J10.13
PB10: J7.44 U2.96 | length 45.1
  Top Layer w0.254: v1(44.704,38.989) 44.724,38.989 48.987,34.726 48.987,34.671 49.347,34.311 U2.96
  Bottom Layer w0.254: J7.44 21.8,61.385 33.018,50.167 33.526,50.167 v1(44.704,38.989)
PB11: J7.43 U2.47 | length 35.6
  Top Layer w0.254: J7.43 21.673,69.139 20.67,68.136 20.67,52.696 32.461,40.905 32.569,40.905 U2.47
PB12: J6.24 J7.46 U2.48 | length 71.5
  Top Layer w0.254: J7.46 19.26,53.257 31.866,40.651 31.898,40.651 31.965,40.584 32.186,40.584 U2.48 32.567,40.28 33.643,39.203 33.822,39.203 v1(33.909,39.116)
  Bottom Layer w0.254: J6.24 3.083,47.231 5.421,47.231 6.083,46.569 6.083,45.335 12.302,39.116 v1(33.909,39.116)
PB13: J6.23 J7.47 U2.51 | length 73.7
  Top Layer w0.254: J7.47 16.927,70.338 16.927,69.56 18.197,68.29 18.197,68.08 18.13,68.013 18.13,67.076 18.669,66.537 18.669,49.657 31.271,37.055 31.391,37.055 U2.51@31.769,37.433 ; U2.51@31.829,37.373 32.469,38.013 32.933,38.013 v1(33.02,38.1)
  Bottom Layer w0.254: J6.23 5.287,45.767 5.287,45.005 12.192,38.1 v1(33.02,38.1)
PB14: J6.26 J7.48 U2.52 | length 73.5
  Top Layer w0.254: J6.26 3.228,48.387 4.485,49.644 5.421,49.644 7.186,47.879 11.949,47.879 23.696,36.131 30.416,36.131 30.48,36.195 30.734,36.195 ; J7.48 17.78,66.485 17.78,49.149 30.734,36.195 ; U2.52 31.71,36.788 31.116,36.195 30.734,36.195
PB15: J6.25 J10.48 U2.53 | length 32.8
  Top Layer w0.254: J6.25 5.225,48.514 6.622,47.117 7.239,47.117 18.672,35.684 31.309,35.684 32.031,36.405 U2.53
PC0: J7.17 U2.61 | length 46.3
  Top Layer w0.254: U2.61 34.722,33.418 35.562,34.258 35.562,36.451 v1(42.545,43.434)
  Bottom Layer w0.254: v1(42.545,43.434) 41.529,44.45 41.529,45.466 53.029,56.966 53.029,67.733 54.312,69.016 J7.17
PC1: J7.18 U2.62
PC2: J7.19 U2.15 | length 31
  Top Layer w0.254: U2.15 46.715,43.304 47.097,43.686 53.086,49.675 53.086,68.194 51.689,69.591 J7.19@51.689,70.993
PC3: J7.20 U2.16 | length 26.7
  Top Layer w0.254: U2.16 46.578,43.992 46.578,44.213 52.578,50.212 52.578,66.523 52.07,67.031 J7.20@52.07,67.612
PC4: J7.31 U2.17 | length 45.9
  Top Layer w0.254: J7.31 38.047,72.059 49.807,72.059 50.642,71.224 50.642,70.203 51.589,69.256 51.589,68.833 50.769,68.013 50.769,67.076 52.07,65.775 52.07,50.265 45.953,44.148 U2.17
PC5: J7.32 R38.1 U2.18 | length 93.9
  Top Layer w0.254: R38.1 8.89,58.42 v1(10.541,58.42) ; J7.32 37.926,68.684 37.926,70.996 38.731,71.802 39.667,71.802 39.925,71.544 41.014,71.544 41.271,71.802 49.7,71.802 50.385,71.117 50.385,70.097 51.332,69.15 51.332,68.939 50.512,68.119 50.512,66.97 51.562,65.92 51.562,50.384 U2.18 45.631,44.376 41.87,40.615 41.87,40.346 v1(41.783,40.259)
  Bottom Layer w0.254: v1(10.541,58.42) 23.622,58.42 v1(41.783,40.259)
PC6: J10.37 U2.33
PC7: J10.38 U2.34
PC8: J10.35 R50.1 U2.63 U4.7 | length 32.4
  Top Layer w0.254: J10.35 28.639,5.016 28.639,25.85 U2.63 ; R50.1 68.703,19.046 U4.7
PC9: J10.36 R51.1 U2.64 U4.8 | length 2
  Top Layer w0.254: R51.1 68.754,20.146 U4.8
PC10: J10.29 R45.1 U2.65 U4.1 | length 33.9
  Top Layer w0.254: U2.65 30.226,26.028 30.226,10.922 J10.29 ; R45.1 68.58,12.088 68.803,12.311 70.477,12.311 U4.1
PC11: J10.28 R47.1 U2.66 U4.2 | length 36.7
  Top Layer w0.254: U2.66 36.449,31.426 37.839,32.816 38.05,32.816 38.735,32.131 38.735,31.369 40.077,30.027 v1(40.077,29.265) ; R47.1 68.508,13.546 U4.2
  Bottom Layer w0.254: J10.28 38.862,3.482 39.878,4.498 39.878,16.792 40.077,16.991 v1(40.077,29.265)
PC12: J10.27 R49.1 U2.78 U4.5 | length 31.3
  Top Layer w0.254: J10.27 39.865,3.823 41.743,3.823 42.405,4.485 42.405,5.421 41.402,6.424 41.402,23.368 42.708,24.674 42.708,27.976 42.736,28.003 42.736,28.123 U2.78 ; R49.1 68.598,16.746 U4.5
PC13: J7.16 U2.79
PC14: C20.2 U2.80 Y1.1 | length 15.1
  Top Layer w0.254: C20.2 42.499,15.748 41.91,16.337 41.91,21.463 42.164,21.717 Y1.1@43.053,21.717 ; U2.80 43.502,28.766 43.502,28.646 43.474,28.619 43.474,28.317 43.434,28.276 Y1.1
PC15: C21.2 U2.7 Y1.2 | length 3.9
  Top Layer w0.254: Y1.2 43.573,19.09 43.996,18.667 43.996,16.01 44.169,15.837 C21.2
PD0: J6.18 J10.26 U2.76 | length 76.2
  Top Layer w0.254: v1(37.592,34.036) 37.679,33.949 37.933,33.949 41.402,30.48 v1(41.402,29.718) 41.376,29.692 41.376,29.108 41.096,28.829 41.096,28.727 41.075,28.706 41.075,28.495 41.687,27.883 U2.76
  Bottom Layer w0.254: J6.18 2.065,38.115 3.033,38.115 3.823,37.325 3.823,35.473 4.485,34.811 6.337,34.811 6.617,34.531 37.097,34.531 v1(37.592,34.036) ; J10.26 41.402,3.228 40.145,4.485 40.145,5.421 41.488,6.764 41.488,18.009 41.148,18.349 41.148,23.845 41.402,24.099 v1(41.402,29.718)
PD1: J6.17 J10.25 U2.77 | length 67.5
  Top Layer w0.254: v1(37.174,36.105) 37.186,36.093 37.186,35.331 42.07,30.447 42.07,29.072 41.814,28.817 41.814,28.515 41.787,28.487 41.787,28.367 42.353,27.802 42.353,25.589 40.897,24.133 40.897,14.968 41.145,14.721 41.145,5.083 J10.25
  Bottom Layer w0.254: J6.17 10.16,38.481 11.684,36.957 36.322,36.957 v1(37.174,36.105)
PD2: J6.16 J10.24 R48.1 U2.81 U4.3 | length 48.7
  Top Layer w0.254: v1(40.894,32.639) 41.509,32.024 41.509,31.625 42.414,30.721 42.414,30.678 43.602,29.49 U2.81 ; R48.1 68.412,14.646 U4.3
  Bottom Layer w0.254: J6.16 3.322,34.318 3.322,33.433 4.891,31.864 13.753,31.864 14.248,31.369 38.354,31.369 39.624,32.639 v1(40.894,32.639)
PD3: J6.15 J10.23 U2.82 | length 68.3
  Top Layer w0.254: v1(40.259,34.417) 41.997,32.679 41.997,31.799 U2.82@43.985,29.811 ; J10.23 43.688,5.34 45.466,7.118 45.466,28.211 44.24,29.436 44.24,29.657 U2.82@44.036,29.862
  Bottom Layer w0.254: J6.15 10.16,35.941 11.049,35.052 39.624,35.052 v1(40.259,34.417)
PD4: J6.14 J6.19 J10.22 U2.83 | length 38.8
  Top Layer w0.254: J6.14 3.39,34.838 3.39,39.458 J6.19 ; U2.83 44.368,29.893 45.974,28.287 45.974,6.297 45.469,5.793 45.098,5.421 45.098,4.485 46.355,3.228 J10.22
PD5: J6.13 J6.20 J10.21 U2.84 | length 89.2
  Top Layer w0.254: J6.20 3.083,42.151 5.421,42.151 6.083,41.489 6.083,34.531 J6.13 ; v3(41.021,35.814) 41.021,34.29 44.468,30.843 44.468,30.617 44.655,30.431 U2.84 ; U2.84@44.765,30.541 44.715,30.491 44.715,30.415 46.609,28.521 46.609,5.975 46.562,5.928 46.562,5.287 J10.21
  Bottom Layer w0.254: J6.20 3.322,39.398 3.322,38.513 4.764,37.071 10.427,37.071 11.878,35.62 38.838,35.62 39.032,35.814 v3(41.021,35.814)
PD6: J6.12 J10.20 U2.85 | length 30.3
  Top Layer w0.254: U2.85@45.053,30.516 47.358,28.211 47.358,4.764 48.895,3.228 J10.20
PD7: J6.11 J6.22 J10.19 U2.86 | length 94
  Top Layer w0.254: J6.22 0.696,42.304 0.696,32.806 1.565,31.937 3.623,31.937 J6.11 ; v1(42.037,35.814) 42.545,35.306 42.545,33.872 45.44,30.977 U2.86 45.517,30.857 47.201,29.174 47.201,29.052 48.768,27.484 J10.19
  Bottom Layer w0.254: J6.22 3.322,41.938 3.322,41.053 4.764,39.611 9.919,39.611 12.065,37.465 41.021,37.465 42.037,36.449 v1(42.037,35.814)
PD8: J6.10 J10.45 U2.87 | length 49.3
  Top Layer w0.254: v1(44.069,33.528) 44.156,33.441 44.156,33.162 45.9,31.418 U2.87
  Bottom Layer w0.254: J6.10 2.298,28.194 2.806,28.702 3.547,28.702 3.696,28.553 3.696,27.726 4.358,27.064 5.294,27.064 6.848,28.618 6.848,28.675 8.402,30.229 38.865,30.229 39.624,30.988 40.894,30.988 43.434,33.528 v1(44.069,33.528)
PD9: J6.9 J10.46 U2.88 | length 48.9
  Top Layer w0.254: v1(43.434,36.195) 44.704,34.925 44.704,33.319 46.283,31.74 U2.88
  Bottom Layer w0.254: J6.9 7.366,30.734 38.608,30.734 39.497,31.623 41.021,31.623 43.431,34.033 43.431,36.192 v1(43.434,36.195)
PD10: J6.8 J10.43 U2.55 | length 28.9
  Top Layer w0.254: J6.8 3.228,25.654 4.637,24.244 5.294,24.244 18.669,10.869 J10.43
PD11: J6.7 J10.44 U2.56 | length 30.4
  Top Layer w0.254: J6.7 19.799,10.681 19.799,2.829 J10.44
PD12: J6.6 J10.41 U2.57 | length 36.8
  Top Layer w0.254: J6.6 0.696,24.244 0.696,26.122 1.358,26.784 5.294,26.784 5.956,26.122 5.956,25.54 21.209,10.287 J10.41
PD13: J6.5 J6.21 J10.42 U2.58 | length 73.8
  Top Layer w0.254: J6.21 14.307,34.207 33.475,34.207 U2.58
  Bottom Layer w0.254: J6.5 3.623,21.911 1.565,21.911 0.696,21.042 0.696,20.106 1.498,19.304 13.843,19.304 17.526,15.621 17.526,3.817 17.675,3.668 19.494,3.668 J10.42
PD14: J6.4 J10.39 U2.59 | length 33.1
  Bottom Layer w0.254: J6.4 3.228,20.574 4.358,21.704 13.602,21.704 23.368,11.938 23.368,5.207 J10.39
PD15: J6.3 J10.40 U2.60 | length 32.8
  Bottom Layer w0.254: J6.3 13.589,20.574 19.812,14.351 19.812,4.318 20.828,3.302 22.606,3.302 23.749,2.159 J10.40
PE0: J10.12 U2.54
PE1: J10.11 U2.97 | length 33.6
  Top Layer w0.254: U2.97 50.013,34.23 50.013,33.045 55.579,27.479 55.647,27.479 57.514,25.611 57.514,25.544 59.055,24.003 J10.11
PE2: J7.11 U2.98 | length 49.1
  Top Layer w0.254: U2.98 50.113,34.714 53.04,31.787 53.25,31.787 64.262,42.799 64.262,63.373 63.469,64.166 63.469,67.971 61.976,69.464 J7.11@61.976,70.866
PE3: J7.12 K3.1 U2.1 | length 164.6
  Top Layer w0.254: K3.1 9.159,11.811 11.557,11.811 11.811,11.557 11.938,11.557 11.938,2.006 13.248,0.696 67.143,0.696 68.085,1.637 68.085,2.294 69.117,3.326 69.313,3.326 70.345,4.358 70.345,9.157 69.922,9.58 64.842,9.58 63.494,10.928 63.494,30.232 v1(58.293,35.433) ; v1(49.149,36.449) 50.038,37.338 50.371,37.338 50.975,37.942 U2.1 51.378,38.225 58.799,38.225 63.754,43.18 63.754,63.246 62.059,64.941 62.059,67.396 J7.12@61.976,67.479
  Bottom Layer w0.254: v1(49.149,36.449) 49.193,36.405 50.248,36.405 50.317,36.474 57.252,36.474 v1(58.293,35.433)
PE4: J7.13 K2.1 U2.2 | length 163.9
  Top Layer w0.254: K2.1 9.382,5.207 9.755,4.834 9.755,3.825 13.141,0.439 69.426,0.439 70.625,1.637 70.625,5.88 70.866,6.121 70.866,9.271 70.07,10.067 65.117,10.067 64.008,11.176 64.008,31.369 v1(59.055,36.322) ; v1(48.641,37.338) 48.728,37.425 48.982,37.425 49.403,37.846 50.175,37.846 50.654,38.325 U2.2 ; U2.2@51.057,38.608 58.293,38.608 63.246,43.561 63.246,62.947 60.929,65.264 60.929,69.135 59.309,70.755 J7.13@59.309,70.993
  Bottom Layer w0.254: v1(48.641,37.338) 58.039,37.338 v1(59.055,36.322)
PE5: J7.14 U2.3 | length 39.5
  Top Layer w0.254: U2.3 50.735,38.991 57.914,38.991 62.865,43.942 62.865,62.484 59.539,65.81 59.539,67.291 J7.14@59.436,67.394
PE6: J7.15 U2.4 | length 43.9
  Top Layer w0.254: U2.4 50.414,39.374 50.534,39.374 50.539,39.369 57.276,39.369 62.484,44.577 62.484,62.103 58.389,66.198 58.389,68.013 58.964,68.588 58.964,68.798 J7.15@56.769,70.993
PE7: J7.45 U2.5 | length 47.5
  Top Layer w0.254: v1(46.609,39.624) 47.042,39.191 49.527,39.191 U2.5
  Bottom Layer w0.254: J7.45 20.63,69.175 21.768,69.175 23.21,67.733 23.21,62.134 41.529,43.815 41.529,43.18 45.085,39.624 v1(46.609,39.624)
PE8: J7.36 U2.38 | length 26
  Top Layer w0.254: J7.36 31.755,67.466 31.755,48.179 36.32,43.613 U2.38
PE9: J7.35 U2.39 | length 30.1
  Top Layer w0.254: J7.35 31.706,69.139 30.703,68.136 30.703,48.526 35.937,43.292 U2.39
PE10: J7.38 U2.40 | length 27.3
  Top Layer w0.254: J7.38 29.293,49.231 35.554,42.971 U2.40
PE11: J7.37 U2.41 | length 31.5
  Top Layer w0.254: J7.37 29.166,69.016 28.163,68.013 28.163,49.537 U2.41
PE12: J7.40 U2.42 | length 28.7
  Top Layer w0.254: J7.40 26.753,50.166 34.711,42.208 U2.42
PE13: J7.39 U2.43 | length 33
  Top Layer w0.254: J7.39 26.626,69.139 25.47,67.983 25.47,50.821 U2.43
PE14: J7.42 U2.44 | length 30.3
  Top Layer w0.254: J7.42 24.025,67.229 24.025,51.562 U2.44
PE15: J7.41 U2.45 | length 34.2
  Top Layer w0.254: J7.41 24.213,69.139 23.21,68.136 23.21,51.596 33.562,41.244 U2.45
RST: C13.1 J6.2 R52.2 RST2.1 U2.14
VBAT: C11.2 Q4.3 U2.6 | length 9.1
  Top Layer w0.254: U2.6 49.771,40.14 50.046,40.14 50.8,40.894 54.991,40.894 56.076,41.979 C11.2 56.17,42.031 57.183,43.044 Q4.3
VCC: Q4.1 R30.2
VREF+: J7.21 R54.1 U2.21 | length 29
  Top Layer w0.254: U2.21 47.452,48.387 R54.1 ; R54.1@47.663,48.349 50.546,51.231 50.546,64.759 48.229,67.076 48.229,68.013 49.232,69.016 J7.21
VREF-: C17.1 C18.1 J7.22 R55.1 U2.20 | length 46.3
  Top Layer w0.254: U2.20 45.271,45.502 45.391,45.502 45.419,45.475 45.729,45.475 51.054,50.8 51.054,65.38 49.359,67.074 J7.22 ; R55.1@47.625,57.404 47.775,57.404 47.998,57.627 47.998,57.777 48.487,58.266 ; C18.1 48.31,50.17 49.447,51.307 C17.1 49.485,51.391 50.038,51.944 50.038,56.715 48.487,58.266 ; v1(48.514,64.643) 48.514,58.293 48.487,58.266
  Bottom Layer w0.254: v1(48.514,64.643) 48.514,64.766 48.768,65.02 48.768,66.523 49.359,67.114 J7.22
pads on no net: D3.A D3.C D4.A D4.C J6.29 J9.6 J9.7 J9.8 J9.9 J9.10 K_UP1.2 L2.A L2.C P2.9 P2.11 P2.15 P2.17 P2.19 U2.8 U2.46 U2.73 U4.10 U4.11 U4.12 U4.13 U6.4
copper on no net: | length 315.2
  Top Layer w0.254: 0,0 85.097,0 85.097,72.5 0,72.5 0,0

## Polygon pours and split planes (outlines as drawn)
no net on Bottom Layer "NONET_L04_P001" (solid, pour order 1): 0,72.39 84.963,72.39 84.963,0.254 0.254,0.254 0,0.508 0,72.39 84.836,72.39 84.963,72.263 84.963,0 0.381,0 0.127,0.254
3V3 on PWR "3V3_L02_P000" (solid, pour order 0): 0.254,72.517 84.709,72.517 84.709,0.254 0.254,0.254
GND on GND "GND_L03_P003" (solid, pour order 3): 0.254,72.517 84.201,72.517 84.836,71.882 84.836,0.889 0,0.889